# Altium PCB Membrane_Board.PcbDoc (part 5 of 5)
Units mm, origin at the board's own origin, x right, y up, seen from the top; angles counter-clockwise.
Board outline 303 x 126.06 mm, 2 copper layers (Top Layer, Bottom Layer), stack 1.499 mm thick; 248 components, 169 nets, 1258 pads, 728 vias.
Unrouted connection lines stored in the file: 317.
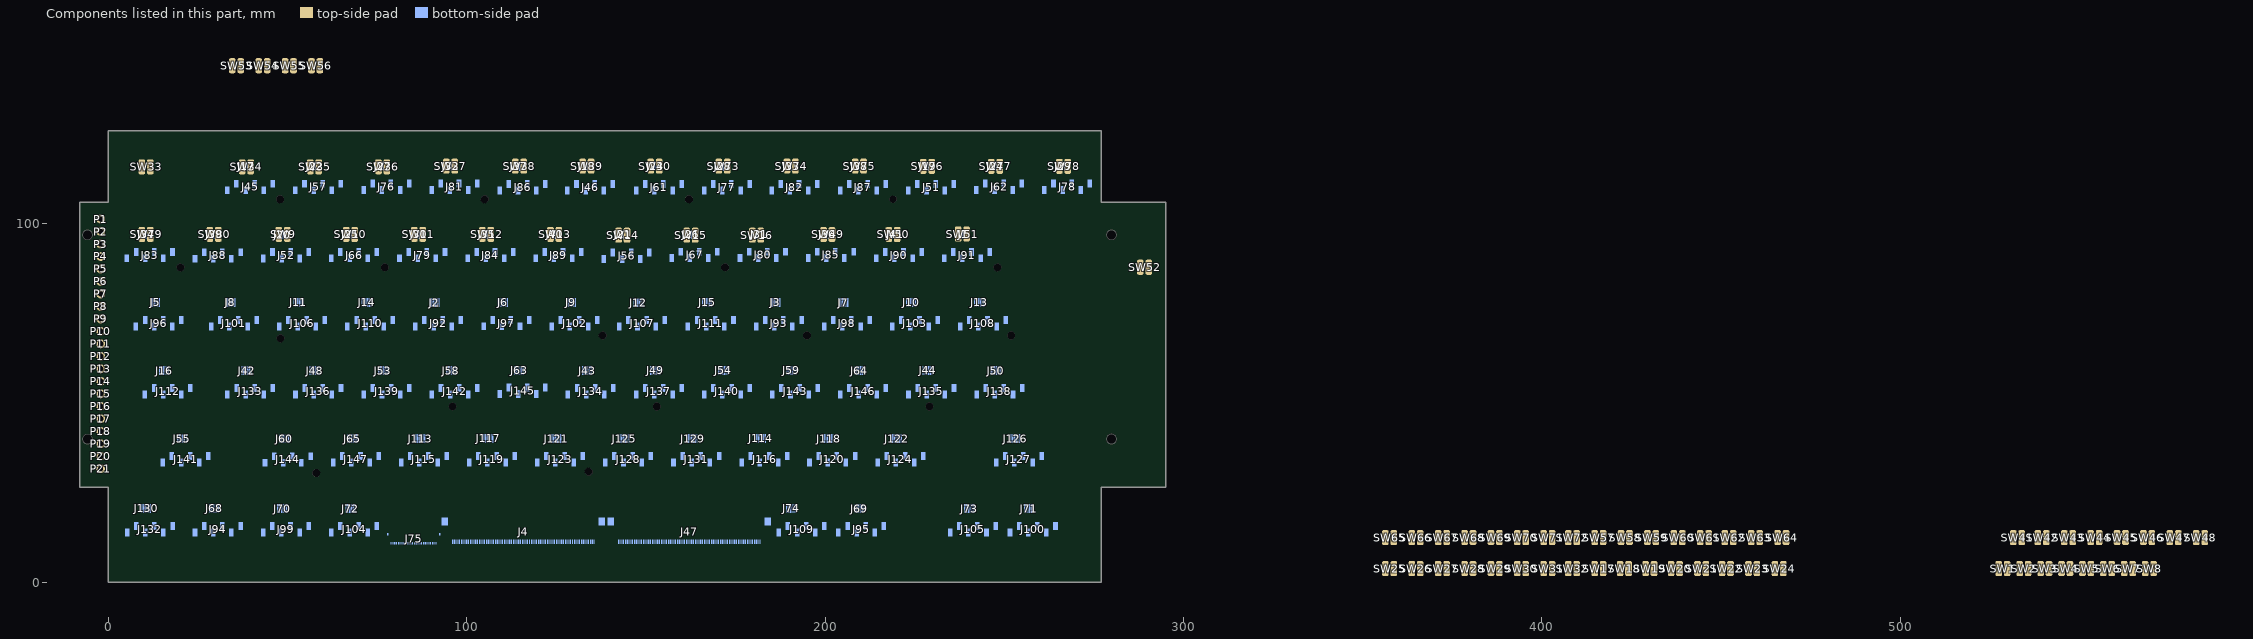
[diagram p5: the components of this part, seen from the top]

## Other copper
Bottom Layer:
  rectangle net I2C1.SCL_2: 59.03,109.728 60.554,112.497
  rectangle net GND: 191.688,19.011 192.527,21.856
  rectangle net VCC_3V3: 216.377,33.641 218.054,36.435
  rectangle net VDD: 61.402,12.483 63.672,15.175
  rectangle net VDD: 42.387,12.483 44.724,15.175
  rectangle net VDD: 32.557,51.142 34.691,52.767
  rectangle net VDD: 123.007,70.141 125.064,72.63
  rectangle net OLED_RST#: 94.483,70.268 96.489,72.529
  rectangle net OLED_RST#: 71.369,32.143 73.502,34.581
  rectangle net GND: 92.171,15.734 94.813,18.096
  rectangle net GND: 92.171,12.737 93.695,18.096
  rectangle net GND: 77.668,10.553 79.014,13.804
  rectangle net GND: 136.418,15.785 141.219,18.249
  rectangle net GND: 182.773,15.76 184.907,19.544
  rectangle net I2C_4.SDA_41: 37.637,51.112 39.335,53.504
  rectangle net I2C_4.SDA_55: 67.152,32.168 68.981,34.581
  rectangle net I2C_4.SDA_46: 132.557,51.218 134.234,53.631
  rectangle net I2C_3.SDA_57: 105.074,32.346 107.157,34.632
  rectangle net I2C_3.SDA_58: 124.048,32.219 126.436,34.53
  rectangle net I2C_3.SDA_59: 142.844,32.32 144.368,34.581
  rectangle net I2C_4.SDA_51: 226.893,51.294 228.95,53.58

## Silkscreen, mask and mechanical layers (free items; w line width, h text height)
Bottom Overlay:
  text "OLED_12" at 249.253,118.485 h0.89
  text "OLED_4" at 97.277,118.459 h0.89
  text "OLED_6" at 135.274,118.459 h0.89
  text "OLED_9" at 192.273,118.459 h0.89
  text "OLED_10" at 211.228,118.452 h0.89
  text "OLED_13" at 268.26,118.459 h0.89
  text "OLED_3" at 78.303,118.434 h0.89
  text "OLED_7" at 154.29,118.434 h0.89
  text "OLED_1" at 40.279,118.408 h0.89
  text "OLED_2" at 59.267,118.408 h0.89
  text "OLED_5" at 116.276,118.383 h0.89
  text "OLED_11" at 230.338,118.383 h0.89
  text "OLED_8" at 173.223,118.358 h0.89
  text "OLED_15" at 31.327,99.435 h0.89
  text "OLED_22" at 164.331,99.435 h0.89
  text "OLED_23" at 183.373,99.435 h0.89
  text "OLED_24" at 202.355,99.435 h0.89
  text "OLED_14" at 12.339,99.409 h0.89
  text "OLED_17" at 69.343,99.409 h0.89
  text "OLED_18" at 88.36,99.409 h0.89
  text "OLED_19" at 107.384,99.409 h0.89
  text "OLED_20" at 126.368,99.409 h0.89
  text "OLED_21" at 145.289,99.409 h0.89
  text "OLED_25" at 221.38,99.409 h0.89
  text "OLED_26" at 240.353,99.409 h0.89
  text "OLED_16" at 50.369,99.358 h0.89
  text "OLED_32" at 111.829,80.435 h0.89
  text "OLED_27" at 14.817,80.41 h0.89
  text "OLED_28" at 35.825,80.41 h0.89
  text "OLED_29" at 54.84,80.41 h0.89
  text "OLED_30" at 73.831,80.41 h0.89
  text "OLED_33" at 130.846,80.41 h0.89
  text "OLED_35" at 168.852,80.41 h0.89
  text "OLED_36" at 187.853,80.41 h0.89
  text "OLED_38" at 225.834,80.41 h0.89
  text "OLED_39" at 244.816,80.41 h0.89
  text "OLED_31" at 92.754,80.385 h0.89
  text "OLED_37" at 206.852,80.385 h0.89
  text "OLED_34" at 149.693,80.334 h0.89
  text "OLED_45" at 116.401,61.436 h0.89
  text "OLED_47" at 154.392,61.436 h0.89
  text "OLED_48" at 173.39,61.436 h0.89
  text "OLED_49" at 192.389,61.436 h0.89
  text "OLED_51" at 230.362,61.436 h0.89
  text "OLED_40" at 17.324,61.411 h0.89
  text "OLED_41" at 40.328,61.411 h0.89
  text "OLED_42" at 59.336,61.411 h0.89
  text "OLED_44" at 97.394,61.411 h0.89
  text "OLED_46" at 135.358,61.411 h0.89
  text "OLED_50" at 211.38,61.411 h0.89
  text "OLED_52" at 249.388,61.411 h0.89
  text "OLED_43" at 78.42,61.385 h0.89
  text "OLED_57" at 107.816,42.462 h0.89
  text "OLED_61" at 183.838,42.462 h0.89
  text "OLED_56" at 88.817,42.437 h0.89
  text "OLED_58" at 126.798,42.437 h0.89
  text "OLED_59" at 145.789,42.437 h0.89
  text "OLED_60" at 164.822,42.437 h0.89
  text "OLED_62" at 202.771,42.437 h0.89
  text "OLED_55" at 69.859,42.412 h0.89
  text "OLED_63" at 221.803,42.412 h0.89
  text "OLED_53" at 22.32,42.386 h0.89
  text "OLED_54" at 50.861,42.386 h0.89
  text "OLED_64" at 254.847,42.248 h0.89
  text "OLED_65" at 12.341,22.941 h0.89
  text "OLED_66" at 31.302,22.93 h0.89
  text "OLED_69" at 192.331,22.93 h0.89
  text "OLED_72" at 242.014,22.922 h0.89
  text "OLED_67" at 50.328,22.904 h0.89
  text "OLED_68" at 69.343,22.904 h0.89
  text "OLED_70" at 211.38,22.904 h0.89
  text "OLED_71" at 258.643,22.904 h0.89
  text "I2C_LINES" at 184.297,18.35 h1.78
Mechanical 2 (Mech3):
  drawing of 905 lines, arcs and shapes, not listed